# Altium PCB PCB2.PcbDoc
Units mm, origin at the board's own origin, x right, y up, seen from the top; angles counter-clockwise.
Board outline 137 x 56 mm, 2 copper layers (Top Layer, Bottom Layer), stack 1.5 mm thick; 78 components, 61 nets, 299 pads, 83 vias.
Unrouted connection lines stored in the file: 1.
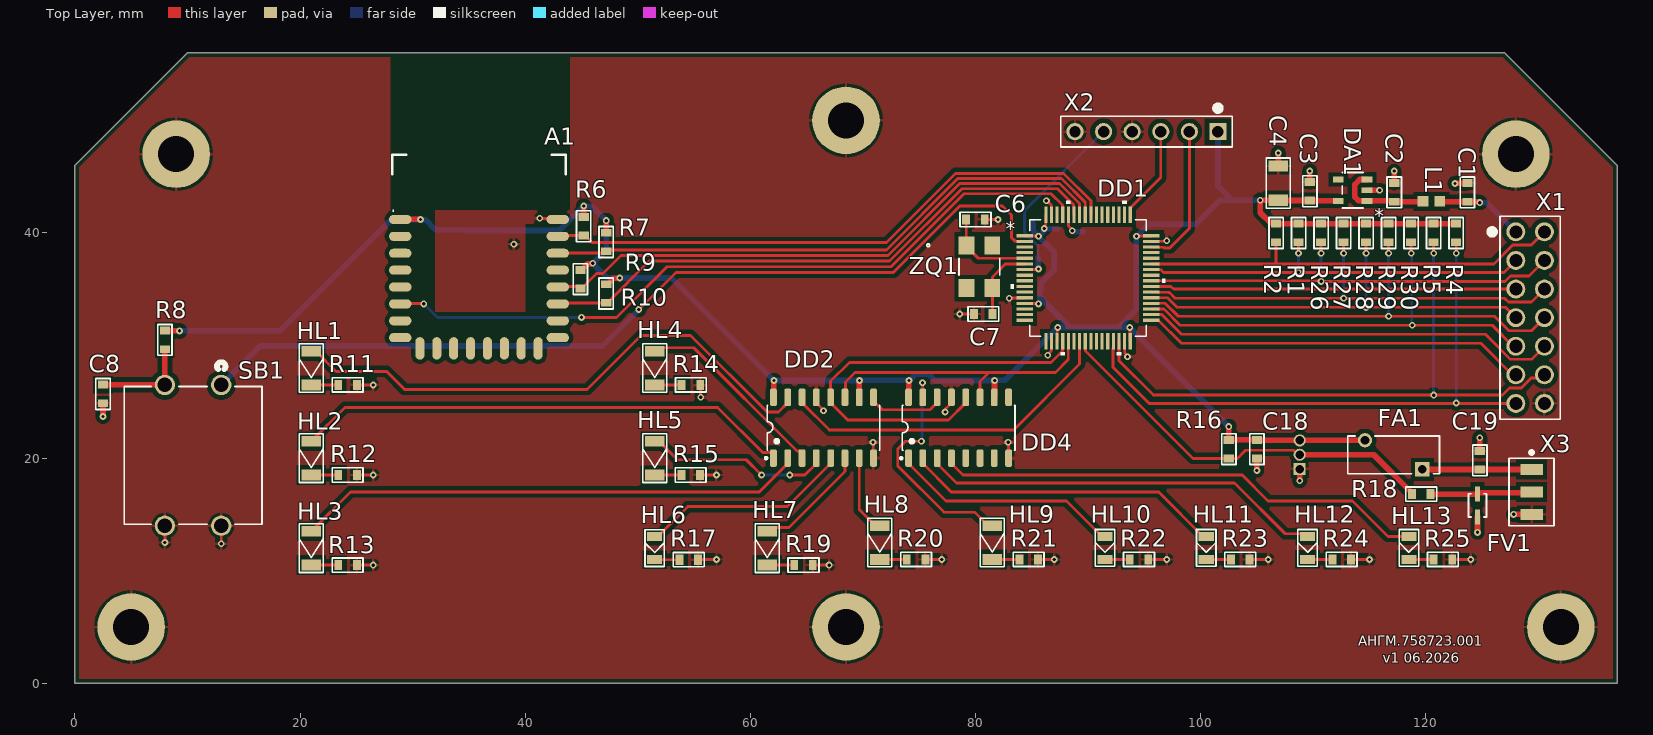
[diagram p0: Top Layer view]
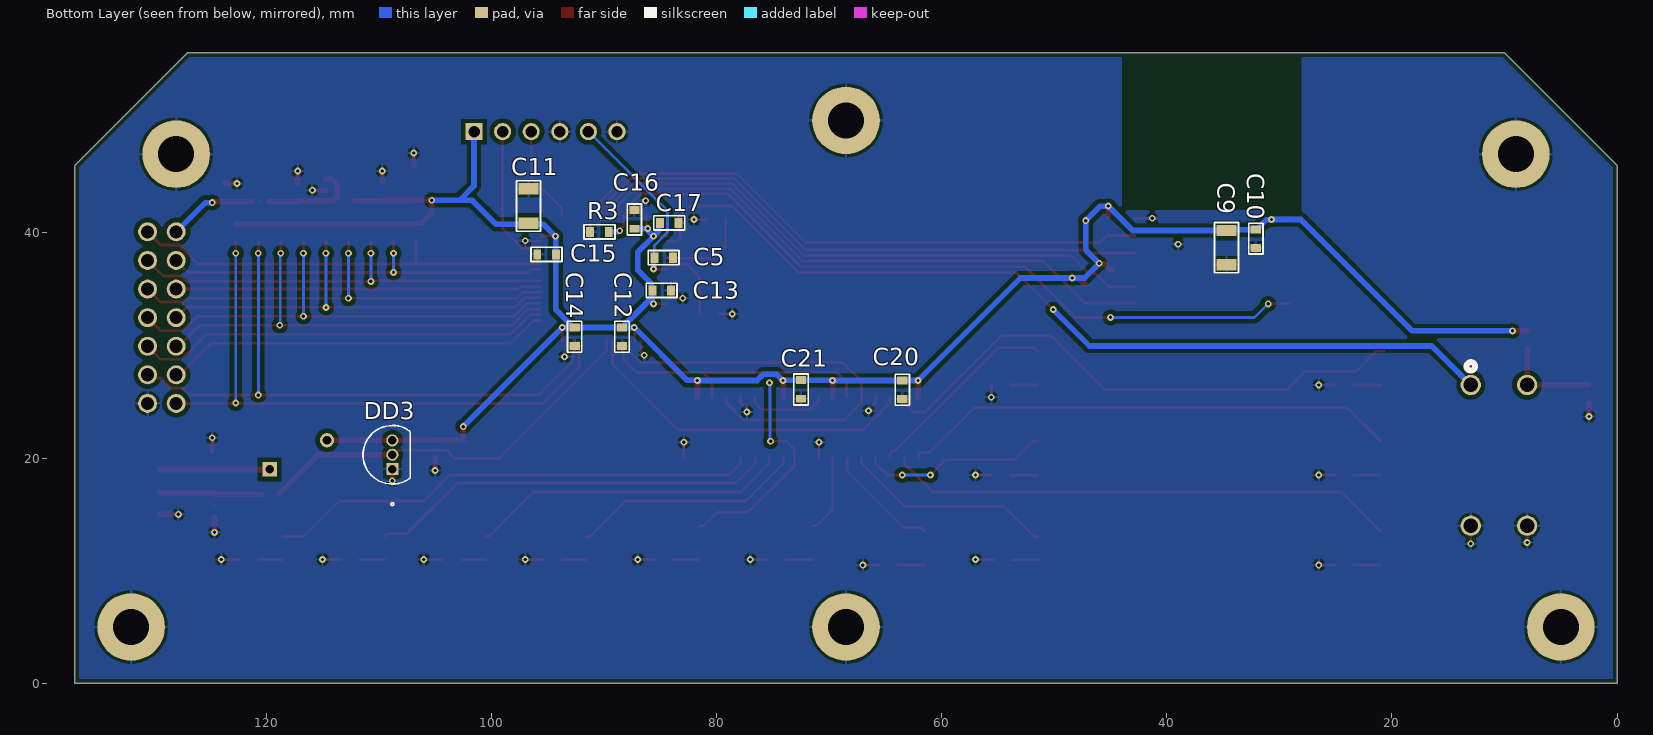
[diagram p1: Bottom Layer view, seen from below]
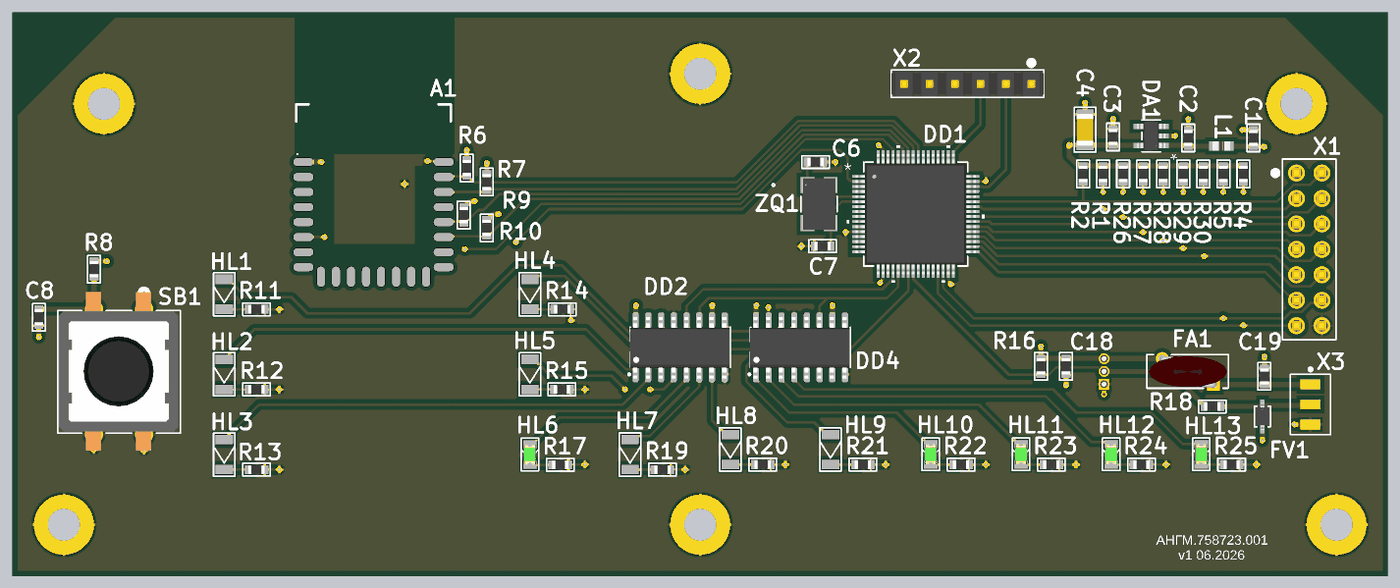
[diagram p2: 3D render of the assembled board from above, using the file's embedded part models]
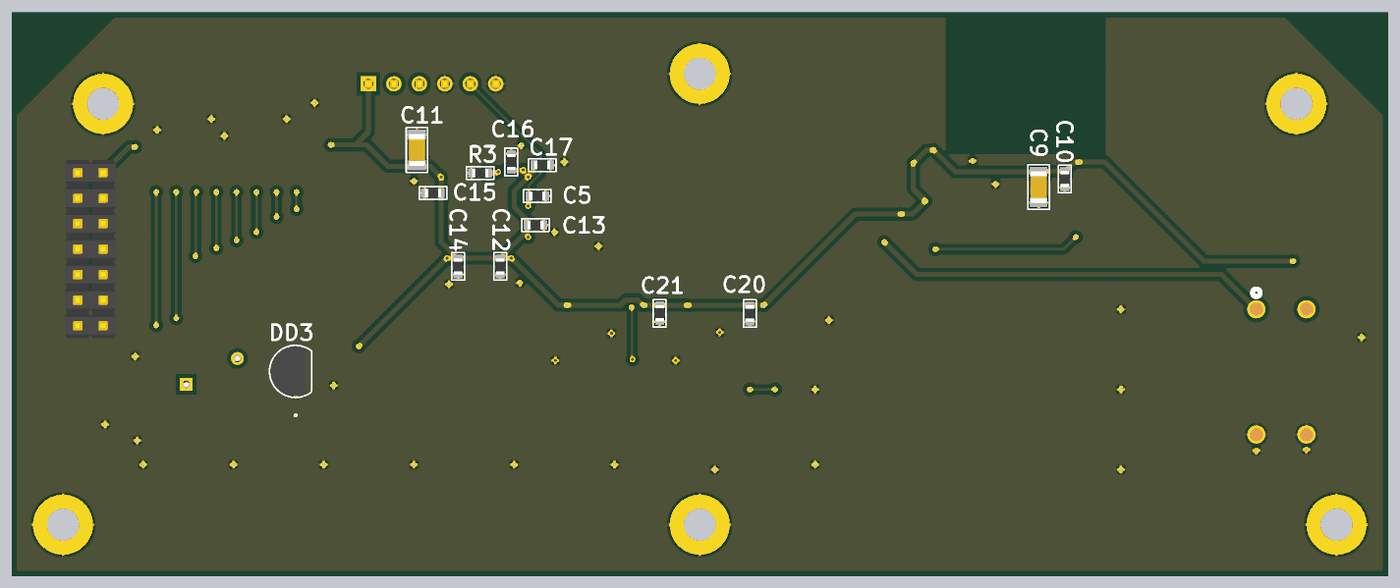
[diagram p3: 3D render of the assembled board from below, using the file's embedded part models]

## Layer stack, top to bottom
Top Solder: solder mask 0.015, Solder Resist, Dk 3.8
Top Layer: signal copper 0.035
Dielectric 1: core 1.43, FR-4, Dk 4.6
Bottom Layer: signal copper 0.035
Bottom Solder: solder mask 0.015, Solder Resist, Dk 3.8

## Board outline
0,0 137,0 137,46 127,56 10,56 0,46

## Design rules (kind name [scope] priority, off if disabled: settings)
BoardOutlineClearance [All] p1: gap=0.4 ignorepadtopadclearanceinfootprint=FALSE
Clearance Polygon [InPolygon] p1: gap=0.4 ignorepadtopadclearanceinfootprint=FALSE
Clearance Clearance_1 [All] p2: gap=0.2 ignorepadtopadclearanceinfootprint=FALSE
ComponentClearance [All] p1: gap=0.25 collisioncheckmode=3 verticalgap=0.25 showdistances=FALSE
HoleSize [All] p1: absolutevalues=TRUE maxlimit=2.54 minlimit=0.3 maxpercent=80.000 minpercent=20.000
MinimumSolderMaskSliver [All] p1: minsoldermaskwidth=0.1
PolygonConnect [All] p1: connectstyle=Relief reliefconductorwidth=0.254 reliefentries=4 polygonreliefangle="90 Angle" airgapwidth=0.254
RoutingVias [All] p1: holewidth=0.3 width=0.6 viastyle="Through Hole" minholewidth=0.3 minwidth=0.6 maxholewidth=1 maxwidth=1.3
SolderMaskExpansion [All] p1: expansion=0.075 istentingtop=FALSE
SupplyNets "Schematic Supply Nets_1" [InNet('3V3')] p1: voltage=0.000
SupplyNets "Schematic Supply Nets" [InNet('GND')] p2: voltage=0.000
UnRoutedNet [All] p1: checkbadconnections=TRUE
Width Width_Power [InNetClass('Power')] p1: maxlimit=3 minlimit=0.5 preferedwidth=1
Width [All] p2: maxlimit=0.5 minlimit=0.2 preferedwidth=0.25
26 further rules are at their usual default settings.

## Classes and differential pairs
component class stm32: A1 C1 C2 C3 C4 C5 C6 C7 C8 C9 C10 C11 C12 C13 C14 C15 C16 C17 DA1 DD1 L1 R1 R2 R3 R4 R5 R6 R7 R8 R9 R10 R26 R27 R28 R29 R30 SB1 X1 X2 ZQ1
component class indication: C18 C19 C20 C21 DD2 DD3 DD4 FA1 FV1 HL1 HL2 HL3 HL4 HL5 HL6 HL7 HL8 HL9 HL10 HL11 HL12 HL13 R11 R12 R13 R14 R15 R16 R17 R18 R19 R20 R21 R22 R23 R24 R25 X3

## Components (designator, comment, footprint, x,y, rotation, side; value= is the part's Value field where it differs from the comment)
A1 "JDY-28M WAVGAT" CAC-150P2011X1495-16N 35.9,36.75 r0 top
C1 "TAJA106K016RNJ Kyocera AVX" RES-0603N 123.7,43.6 r270 top value=10мк
C2 "GRM188R61E105KA12D Murata" RES-0603N 117.2,43.6 r270 top value=1мк
C3 "GRM188R61E105KA12D Murata" RES-0603N 109.7,43.7 r270 top value=1мк
C4 "TAJA106K016RNJ Kyocera AVX" CAP-1206N 106.9,44.425 r270 top
C5 "GRM188R71H104K Murata" RES-0603N 84.7,37.8 r0 bottom value=0.1мк
C6 "CC0603FRNPO9BN220 Yageo" RES-0603N 80,41.2 r180 top value=22
C7 "CC0603FRNPO9BN220 Yageo" RES-0603N 80.7,32.8 r0 top value=22
C8 "GRM188R71H104K Murata" RES-0603N 2.5,25.7 r270 top value=0.1мк
C9 "TAJA106K016RNJ Kyocera AVX" CAP-1206N 34.7,38.7 r90 bottom value=10мк
C10 "GRM188R71H104K Murata" RES-0603N 32.1,39.5 r90 bottom value=0.1мк
C11 "TAJA106K016RNJ Kyocera AVX" CAP-1206N 96.7,42.4 r270 bottom value=10мк
C12 "GRM188R71H104K Murata" RES-0603N 88.4,30.775 r90 bottom value=0.1мк
C13 "GRM188R71H104K Murata" RES-0603N 84.875,34.9 r0 bottom value=0.1мк
C14 "GRM188R71H104K Murata" RES-0603N 92.6,30.775 r90 bottom value=0.1мк
C15 "GRM188R71H104K Murata" RES-0603N 95.1,38.1 r180 bottom value=0.1мк
C16 "GRM188R71H104K Murata" RES-0603N 87.3,41.2 r270 bottom value=0.1мк
C17 "GRM188R71H104K Murata" RES-0603N 84.2,40.9 r0 bottom value=0.1мк
C18 "GRM188R71H104K Murata" RES-0603N 105,20.8 r270 top value=1мк
C19 "GRM188R71H104K Murata" RES-0603N 124.8,19.8 r90 top value=1мк
C20 "GRM188R71H104K Murata" RES-0603N 63.5,26.075 r90 bottom value=0.1мк
C21 "GRM188R71H104K Murata" RES-0603N 72.5,26.1 r90 bottom value=0.1мк
DA1 "ADP150AUJZ-3.3-R7 Analog Devices" UJ_5_ADI 113.5,43.8 r180 top
DD1 "STM32L431RCT6 STMicroelectronics" LQFP-64 90,36 r0 top
DD2 "74HC595D Nexperia" SO-16 66.5,22.7 r0 top
DD3 "NS18B20-QTOS Novosense" 21-0248A_Q3-1_MXM 108.8,19.03 r90 bottom
DD4 "74HC595D Nexperia" SO-16 78.5,22.7 r0 top
FA1 "MF-R005-0 Bourns" FUSE_MF-R050-0-17_BRN 119.7,19 r180 top
FV1 "PESD3V3L1BA Keen Side" SOD323_NEX 124.6,15.8 r270 top
HL1 "APTD3216LCGCK Kingbright" LED-1206N 21,28 r90 top
HL2 "APTD3216LCGCK Kingbright" LED-1206N 21,20 r90 top
HL3 "APTD3216LCGCK Kingbright" LED-1206N 21,12 r90 top
HL4 "APTD3216LCGCK Kingbright" LED-1206N 51.501,28.001 r90 top
HL5 "APTD3216LSYCK Kingbright" LED-1206N 51.501,20.001 r90 top
HL6 "APTD2012LSURCK Kingbright" LED-0805N 51.501,12.001 r90 top
HL7 "APTD3216LCGCK Kingbright" LED-1206N 61.501,12.001 r90 top
HL8 "APTD3216LCGCK Kingbright" LED-1206N 71.501,12.501 r90 top
HL9 "APTD3216LCGCK Kingbright" LED-1206N 81.501,12.501 r90 top
HL10 "APTD2012LSURCK Kingbright" LED-0805N 91.501,12.026 r90 top
HL11 "APTD2012LSURCK Kingbright" LED-0805N 100.501,12.026 r90 top
HL12 "APTD2012LSURCK Kingbright" LED-0805N 109.501,12.026 r90 top
HL13 "APTD2012LSURCK Kingbright" LED-0805N 118.501,12.026 r90 top
L1 "BLM18AG601SN1D Murata Electronics" FILTER_BLM18AG_MUR 120.5,42.8 r180 top
R1 "RC0603FR-072K2L Yageo" RES-0603N 108.7,40 r90 top value=2.2к
R2 "RC0603FR-072K2L Yageo" RES-0603N 106.7,40 r90 top value=2.2к
R3 "RC0603FR-0710KL Yageo" RES-0603N 90.4,40.1 r180 bottom value=10к
R4 "RC0603FR-072K2L Yageo" RES-0603N 122.7,40 r90 top value=2.2к
R5 "RC0603FR-072K2L Yageo" RES-0603N 120.7,40 r90 top value=2.2к
R6 "RC0603FR-0710KL Yageo" RES-0603N 45.2,40.6 r90 top value=10к
R7 "RC0603FR-0710KL Yageo" RES-0603N 47.2,39.2 r90 top value=10к
R8 "RC0603FR-0710KL Yageo" RES-0603N 8,30.5 r90 top value=10к
R9 "RC0603FR-0710KL Yageo" RES-0603N 44.9,35.9 r270 top value=10к
R10 "RC0603FR-0710KL Yageo" RES-0603N 47.2,34.625 r270 top value=10к
R11 "RC0603FR-0747RL Yageo" RES-0603N 24.225,26.5 r0 top value=47
R12 "RC0603FR-0747RL Yageo" RES-0603N 24.225,18.5 r0 top value=47
R13 "RC0603FR-0747RL Yageo" RES-0603N 24.225,10.5 r0 top value=47
R14 "RC0603FR-0747RL Yageo" RES-0603N 54.726,26.501 r0 top value=47
R15 "RC0603FR-07180RL Yageo" RES-0603N 54.701,18.501 r0 top value=180
R16 "RC0603FR-074K7L Yageo" RES-0603N 102.5,20.8 r90 top value=4.7к
R17 "RC0603FR-07200RL Yageo" RES-0603N 54.526,10.976 r0 top value=200
R18 "RC0603FR-0751RL Yageo" RES-0603N 119.6,16.8 r180 top value=51
R19 "RC0603FR-0747RL Yageo" RES-0603N 64.726,10.501 r0 top value=47
R20 "RC0603FR-0747RL Yageo" RES-0603N 74.726,11.001 r0 top value=47
R21 "RC0603FR-0747RL Yageo" RES-0603N 84.726,11.001 r0 top value=47
R22 "RC0603FR-07200RL Yageo" RES-0603N 94.526,11.001 r0 top value=200
R23 "RC0603FR-07200RL Yageo" RES-0603N 103.526,11.001 r0 top value=200
R24 "RC0603FR-07200RL Yageo" RES-0603N 112.526,11.001 r0 top value=200
R25 "RC0603FR-07200RL Yageo" RES-0603N 121.526,11.001 r0 top value=200
R26 "RC0603FR-0710KL Yageo" RES-0603N 110.7,40 r90 top value=10k
R27 "RC0603FR-0710KL Yageo" RES-0603N 112.7,40 r90 top value=10k
R28 "RC0603FR-0710KL Yageo" RES-0603N 114.7,40 r90 top value=10k
R29 "RC0603FR-0710KL Yageo" RES-0603N 116.7,40 r270 top value=10k
R30 "RC0603FR-0710KL Yageo" RES-0603N 118.7,40 r270 top value=10k
SB1 "KAN1211-1201B KAN" SW4_PTS125SM432LFS_CNK 13,26.5 r270 top
X1 "DS1021-2x7 Connfly" CONN_215447-7_TEC 128,40.1 r270 top
X2 "DS1022-1x6R Connfly" CONN_2011-1X06G00SB_06P_OUP 101.54,49 r180 top
X3 "DS1110-01-3 Connfly" CONN3_1546551-3_TEC 129.4,18 r270 top
ZQ1 "KSE-7I08000MAF343ZA3 KEEN SIDE" C5S_5X3P2_SMD_AKR 80.35,37 r0 top

## Footprints (in the part's own frame and the unit in brackets; to place one, negate y for a bottom-side part, rotate by r counter-clockwise, add the part's x,y. Pads: shape width x height; smd on the part's side, far side on the other; paste and mask are expansions set on the pad)
21-0248A_Q3-1_MXM [mm]
  rect 1.07x1.07 / inner round 1.524 / far side rect 1.07x1.07 hole 0.762 paste-2539.97 mask+0: 1(0,0)
  round 1.07 / inner round 1.524 / far side round 1.07 hole 0.762 paste-2539.97 mask+0: 2(1.27,0) 3(2.54,0)
  silkscreen extent -3.24,-1.59 3.87,2.6, body extent -1.21,-0.95 3.75,2.48, height 8.95
C5S_5X3P2_SMD_AKR [mm]
  rect 1.397x1.6 smd paste+0 mask+0: 1(-1.15,1.9) 2(-1.15,-1.9) 3(1.15,-1.9) 4(1.15,1.9)
  silkscreen extent -4.68,-0.77 1.8,2.03, body extent -1.68,-2.58 1.68,2.58, height 0.76
CAC-150P2011X1495-16N [mm] "Chip Array, Concave, 16-Leads, Pitch 1,50mm,  Body 20,11x14,95mm,  IPC Medium Density"
  oval 2x0.8 smd: 1(-7,4.45) 2(-7,2.95) 3(-7,1.45) 4(-7,-0.05) 5(-7,-1.55) 6(-7,-3.05) 7(-7,-4.55) 8(-7,-6.05) 17(7,-6.05) 18(7,-4.55) 19(7,-3.05) 20(7,-1.55) 21(7,-0.05) 22(7,1.45) 23(7,2.95) 24(7,4.45)
  oval 0.8x2 smd: 9(-5.25,-7) 10(-3.75,-7) 11(-2.25,-7) 12(-0.75,-7) 13(0.75,-7) 14(2.25,-7) 15(3.75,-7) 16(5.25,-7)
  silkscreen extent -7.7,5.19 7.7,10.2
CAP-1206N [mm] "Chip Capacitor, 2-Leads, Body 3,20x1,60mm, IPC Medium Density"
  rect 1x1.75 smd: 1(-1.525,0) 2(1.525,0)
  silkscreen extent -2.24,-1.07 2.24,1.07, body extent -1.6,-0.8 1.6,0.8, height 1.6
CONN3_1546551-3_TEC [mm]
  rect 1x2 smd paste-2539.97 mask+0: 1(1,0) 2(-1,0) 3(3,0)
  silkscreen extent -2.65,-2 4,2
CONN_2011-1X06G00SB_06P_OUP [mil]
  rect 60x60 / inner round 60 / far side rect 60x60 hole 40 paste-99999 mask+0: 1(0,0)
  round 60 hole 40 paste-99999 mask+0: 2(100,0) 3(200,0) 4(300,0) 5(400,0) 6(500,0)
  silkscreen extent -50,-92 550,54, body extent -50,-49 550,49, height 339
CONN_215447-7_TEC [mil]
  round 66 / inner round 60 / far side round 66 hole 46 paste-99999 mask+0: 1(0,0) 2(0,100) 3(100,0) 4(100,100) 5(200,0) 6(200,100) 7(300,0) 8(300,100) 9(400,0) 10(400,100) 11(500,0) 12(500,100) 13(600,0) 14(600,100)
  silkscreen extent -55,-93 655,155, body extent -51,-50 649,150, height 141
FILTER_BLM18AG_MUR [mil]
  rect 37.78x37 smd paste+0 mask+0: 1(-29.39,0) 2(29.39,0)
  Top Layer keep-out region: 0,0 0,0 0,0 0,0
  Keep-Out Layer region: 0,0 0,0 0,0
  body extent -34,-19 34,19, height 37
FUSE_MF-R050-0-17_BRN [mm]
  rect 1.27x1.27 / inner round 1.524 / far side rect 1.27x1.27 hole 0.762 paste-2539.97 mask+0: 1(0,0)
  round 1.27 / inner round 1.524 / far side round 1.27 hole 0.762 paste-2539.97 mask+0: 2(5.1,-2.59)
  silkscreen extent -1.53,-2.97 6.63,0.38, body extent -1.41,-2.85 6.49,0.31, height 13.15
LED-0805N [mm] "Chip Resistor, 2-Leads, Body 2,10x1,30mm, IPC Medium Density"
  rect 0.8x1.35 smd: 1(1.025,0) 2(-1.025,0)
  silkscreen extent -1.63,-0.86 1.63,0.86, body extent -1.01,-0.62 1.01,0.62, height 1.1
LED-1206N [mm]
  rect 0.95x1.75 smd: 1(1.5,0) 2(-1.5,0)
  silkscreen extent -2.16,-1.07 2.16,1.07, body extent -1.55,-0.8 1.55,0.8, height 0.55
LQFP-64 [mil]
  rect 57.56x11 smd paste+0 mask+0: 1(-221.5,147.64) 2(-221.5,127.95) 3(-221.5,108.27) 4(-221.5,88.58) 5(-221.5,68.9) 6(-221.5,49.21) 7(-221.5,29.53) 8(-221.5,9.84) 9(-221.5,-9.84) 10(-221.5,-29.53) 11(-221.5,-49.21) 12(-221.5,-68.9) 13(-221.5,-88.58) 14(-221.5,-108.27) 15(-221.5,-127.95) 16(-221.5,-147.64) 33(221.5,-147.64) 34(221.5,-127.95) 35(221.5,-108.27) 36(221.5,-88.58) 37(221.5,-68.9) 38(221.5,-49.21) 39(221.5,-29.53) 40(221.5,-9.84) 41(221.5,9.84) 42(221.5,29.53) 43(221.5,49.21) 44(221.5,68.9) 45(221.5,88.58) 46(221.5,108.27) 47(221.5,127.95) 48(221.5,147.64)
  rect 11x57.56 smd paste+0 mask+0: 17(-147.64,-221.5) 18(-127.95,-221.5) 19(-108.27,-221.5) 20(-88.58,-221.5) 21(-68.9,-221.5) 22(-49.21,-221.5) 23(-29.53,-221.5) 24(-9.84,-221.5) 25(9.84,-221.5) 26(29.53,-221.5) 27(49.21,-221.5) 28(68.9,-221.5) 29(88.58,-221.5) 30(108.27,-221.5) 31(127.95,-221.5) 32(147.64,-221.5) 49(147.64,221.5) 50(127.95,221.5) 51(108.27,221.5) 52(88.58,221.5) 53(68.9,221.5) 54(49.21,221.5) 55(29.53,221.5) 56(9.84,221.5) 57(-9.84,221.5) 58(-29.53,221.5) 59(-49.21,221.5) 60(-68.9,221.5) 61(-88.58,221.5) 62(-108.27,221.5) 63(-127.95,221.5) 64(-147.64,221.5)
  silkscreen extent -270,-270 270,270, body extent -236,-236 236,236, height 63
RES-0603N [mm] "Chip Resistor, 2-Leads, Body 1,60x0,85mm, IPC Medium Density"
  rect 0.7x0.9 smd: 1(-0.825,0) 2(0.825,0)
  silkscreen extent -1.37,-0.64 1.37,0.64, body extent -0.8,-0.43 0.8,0.43, height 0.45
SO-16 [mm]
  rrect50% 0.6x1.55 smd mask+0.05: 1(-4.445,-2.7) 2(-3.175,-2.7) 3(-1.905,-2.7) 4(-0.635,-2.7) 5(0.635,-2.7) 6(1.905,-2.7) 7(3.175,-2.7) 8(4.445,-2.7) 9(4.445,2.7) 10(3.175,2.7) 11(1.905,2.7) 12(0.635,2.7) 13(-0.635,2.7) 14(-1.905,2.7) 15(-3.175,2.7) 16(-4.445,2.7)
  silkscreen extent -5.19,-2.8 5.01,2, body extent -5.03,-3.12 4.94,3.02, height 1.73
SOD323_NEX [mil]
  rect 53.5x18 smd paste+0 mask+0: 1(-40.25,0) 2(40.25,0)
  Keep-Out Layer region: 0,0 0,0 0,0 0,0
  silkscreen extent -41,-32 41,32, body extent -53,-26 53,26, height 43
SW4_PTS125SM432LFS_CNK [mil]
  round 71 hole 51 paste-99999 mask+0: 1(0,0) 2(0,-196.85) 3(492.13,0) 4(492.13,-196.85)
  silkscreen extent -80,-339 487,143, body extent -67,-336 555,136, height 512
UJ_5_ADI [mil]
  rect 37.28x20 smd paste+0 mask+0: 1(-50.14,37.4) 2(-50.14,0) 3(-50.14,-37.4) 4(50.14,-37.4) 5(50.14,37.4)
  silkscreen extent -37,-62 37,62, body extent -55,-57 55,57, height 39

## Part data
A1: library part JDY-28M, Group=Модуль, Name="JDY-28M WAVGAT"
C1 C2 C3 C4 C5 C6 C7 C8 C9 C10 C11 C12 C13 C14 C15 C16 C17 C18 C19 C20 C21: library part CAP, Group=Конденсатор
  C1 C4 C9 C11: Name="TAJA106K016RNJ Kyocera AVX", Причечание="10 мкФ - 16 В - тип A ±10% танталовый"
  C2 C3 C18 C19: Name="GRM188R61E105KA12D Murata", Причечание="1 мкФ - 25 В - X5R ±10%"
  C5 C8 C10 C12 C13 C14 C15 C16 C17 C20 C21: Name="GRM188R71H104K Murata", Причечание="0.1 мкФ - 50 В - X7R ±10%"
  C6 C7: Name="CC0603FRNPO9BN220 Yageo", Причечание="22 пФ - 50 В - NP0 ±1%"
DA1: library part ADP150AUJZ-3.3-R7, "Ultralow Noise, 150 mA CMOS Linear Regulator", Manufacturer_Name="Analog Devices Inc", Copyright="Copyright (C) 2025 Ultra Librarian. All rights reserved.", Group=Микросхема, Manufacturer_Part_Number=ADP150AUJZ-3.3-R7, Name="ADP150AUJZ-3.3-R7 Analog Devices", RefDes=RefDes, Type=Type, Причечание="Линейный стабилизатор 3.3В"
DD1: library part STM32L431RCT6, Group=Микросхема, Name="STM32L431RCT6 STMicroelectronics", Причечание="Микроконтроллер ARM 32-bit Cortex-M4"
DD2 DD4: library part 74HC595, "8-Bit Shift Register with 3-State Output Registers", Group=Микросхема, Name="74HC595D Nexperia", OriginalSource=AltTab, Причечание="8-битный сдвиговый регистр"
DD3: library part DS18B20+, "Programmable Resolution 1-Wire Digital Thermometer", Manufacturer_Name="Analog Devices Inc", Copyright="Copyright (C) 2025 Ultra Librarian. All rights reserved.", Group=Микросхема, Manufacturer_Part_Number=DS18B20+, Name="NS18B20-QTOS Novosense", RefDes=RefDes, Type=Type, Причечание="Высокоточный датчик температуры"
FA1: library part MF-R050-0-17, "MF-R050-0-17", Manufacturer_Name="Bourns Electronics", Copyright="Copyright (C) 2025 Ultra Librarian. All rights reserved.", Group=Предохранитель, Manufacturer_Part_Number=MF-R050-0-17, Name="MF-R005-0 Bourns", Причечание="Самовосстанавливающийся 0.05А"
FV1: library part PESD3V3L1BA, "Description", Manufacturer_Name=Nexperia, Copyright="Copyright (C) 2025 Ultra Librarian. All rights reserved.", Group=Диод, Manufacturer_Part_Number=PESD3V3L1BA, Name="PESD3V3L1BA Keen Side", Причечание="TVS-диод (защита от ESD) 3.3В"
HL1 HL2 HL3 HL4 HL5 HL6 HL7 HL8 HL9 HL10 HL11 HL12 HL13: library part LED, "Light Emittering Diode", Package=*0603, PartValue="LED*0603 *", Group=Диод, OriginalSource=AltTab
  HL1 HL2 HL3 HL4 HL7 HL8 HL9: Name="APTD3216LCGCK Kingbright", Причечание="Светодиод зеленый"
  HL5: Name="APTD3216LSYCK Kingbright", Причечание="Светодиод желтый"
  HL6 HL10 HL11 HL12 HL13: Name="APTD2012LSURCK Kingbright", Причечание="Светодиод красный"
L1: library part BLM18AG601SN1D, Group=Дроссель, Name="BLM18AG601SN1D Murata Electronics", Причечание="Дроссель подавления ЭМП 600 Ом, 0.5А"
R1 R2 R3 R4 R5 R6 R7 R8 R9 R10 R11 R12 R13 R14 R15 R16 R17 R18 R19 R20 R21 R22 R23 R24 R25 R26 R27 R28 R29 R30: library part RES, Group=Резистор
  R1 R2 R4 R5: Name="RC0603FR-072K2L Yageo", Причечание="0.1 Вт - 2.2 кОм ±1%"
  R3 R6 R7 R8 R9 R10 R26 R27 R28 R29 R30: Name="RC0603FR-0710KL Yageo", Причечание="0.1 Вт - 10 кОм ±1%"
  R11 R12 R13 R14 R19 R20 R21: Name="RC0603FR-0747RL Yageo", Причечание="0.1 Вт - 47 Ом ±1%"
  R15: Name="RC0603FR-07180RL Yageo", Причечание="0.1 Вт - 180 Ом ±1%"
  R16: Name="RC0603FR-074K7L Yageo", Причечание="0.1 Вт - 4.7 кОм ±1%"
  R17 R22 R23 R24 R25: Name="RC0603FR-07200RL Yageo", Причечание="0.1 Вт - 200 Ом ±1%"
  R18: Name="RC0603FR-0751RL Yageo", Причечание="0.1 Вт - 51 Ом ±1%"
SB1: library part KAN1211-1201B, "KAN1211-1201B", Manufacturer_Name="C&K Components", Manufacturer_Part_Number=PTS125SM432LFS, Copyright="Copyright (C) 2025 Ultra Librarian. All rights reserved.", Group=Кнопка, Name="KAN1211-1201B KAN", Причечание="Кнопка тактовая 12x12x12 мм"
X1: library part 215447-7, "2x7 POS AMPMODU MOD II HDR ACTION PIN", Manufacturer_Name="TE Connectivity", Copyright="Copyright (C) 2025 Ultra Librarian. All rights reserved.", Group=Вилка, Manufacturer_Part_Number=215447-7, Name="DS1021-2x7 Connfly", RefDes=RefDes, Type=Type, Причечание="Вилка штыревая прямая 2.54мм 2x7 pin"
X2: library part 2011-1X06G00SB, "KLS1-207-1-06-S, Вилка штыревая 2.54мм 1x6 угловая", Manufacturer_Name=Oupiin, Copyright="Copyright (C) 2025 Ultra Librarian. All rights reserved.", Group=Вилка, Manufacturer_Part_Number=2011-1X06G00SB, Name="DS1022-1x6R Connfly", RefDes=RefDes, Type=Type, Причечание="Вилка штыревая угловая 2.54мм 1x6 pin"
X3: library part 1546551-3, "3P,STRAIGHT,SIDE ENTRY,3.5MM", Manufacturer_Name="TE Connectivity", Copyright="Copyright (C) 2026 Ultra Librarian. All rights reserved.", Group=Вилка, Manufacturer_Part_Number=1546551-3, Name="DS1110-01-3 Connfly", RefDes=RefDes, Type=Type, Причечание="Разъем миниатюрный 3 pin"
ZQ1: library part C5S-8.000-18-3030-X-R, "KSE-7I08000MAF343ZA3", Manufacturer_Name=Aker, Copyright="Copyright (C) 2025 Ultra Librarian. All rights reserved.", Group=Резонатор, Manufacturer_Part_Number=C5S-8.000-18-3030-X-R, Name="KSE-7I08000MAF343ZA3 KEEN SIDE", RefDes=RefDes, Type=Type

## Free pads (board coordinates)
  round 6 hole 3.2 paste-2539.97: 1(9,47) 2(68.5,50) 3(128,47) 4(132,5) 5(68.5,5) 6(5,5)

## Via types
v1: diameter 0.6, hole 0.3, Top Layer to Bottom Layer, 83 vias

## Nets (pads, with @x,y where several pads share a name; then routed paths per layer and width w, separated by ;. In a path a pad name is that pad's centre, name@x,y a point inside that pad or via, vN(x,y) a via of type N, cw(c..) or ccw(c..) an arc to the next point about the centre after c; other vN are vias at no path point)
3V3: A1.1 C3.2 C4.2 C9.2 C10.2 C11.2 C12.2 C13.2 C14.2 C15.2 C16.2 C17.2 C18.1 C20.2 C21.2 DA1.5 DD1.1 DD1.13 DD1.19 DD1.32 DD1.48 DD1.64 DD2.10 DD2.16 DD3.3 DD4.10 DD4.16 FA1.2 R1.2 R2.2 R4.2 R5.2 R6.2 R7.2 R8.2 R9.1 R10.1 R16.2 R26.2 R27.2 R28.2 R29.1 R30.1 X2.1 | length 217.7
  Top Layer w0.25: DD2.16 DD2.16@62.078,25.423 ; DD4.16 DD4.16@74.077,25.422 ; DD4.10 DD4.10@81.687,25.412 ; DD1.13 84.389,33.735 85.565,33.735 v1(85.6,33.7) ; DD1.1 84.389,39.735 85.565,39.735 v1(85.6,39.7) ; v1(86.1,40.4) 86.167,40.467 86.167,40.662 86.235,40.73 86.235,41.611 DD1.64 ; DD1.19 87.265,30.389 87.265,31.565 v1(87.3,31.6) ; v1(93.7,31.6) 93.735,31.565 93.735,30.389 DD1.32 ; v1(94.3,39.7) 94.335,39.735 95.611,39.735 DD1.48
  Top Layer w0.5: R8.2 8.012,31.313 9.287,31.313 v1(9.3,31.3) ; A1.1@29.125,41.275 29.181,41.219 30.681,41.219 v1(30.7,41.2) ; R9.1 45,36.725 45.556,37.281 45.981,37.281 v1(46,37.3) ; R6.2 v1(45.2,42.4) ; R10.1 47.3,35.45 47.831,35.981 48.381,35.981 v1(48.4,36) ; R7.2 v1(47.2,41.1) ; DD2.16@62.078,25.423 v1@62.078,26.878 ; DD2.10 69.687,25.412 69.687,26.887 v1(69.7,26.9) ; DD4.16@74.077,25.422 v1@74.077,26.878 ; DD4.10@81.687,25.412 v1@81.687,26.888 ; v1(102.5,22.8) R16.2 C18.1 105.027,21.598 108.773,21.598 DD3.3 108.81,21.58 FA1.2@114.6,21.58 ; DA1.5 112.222,42.854 109.721,42.854 C3.2 109.687,42.888 106.912,42.888 C4.2 v1(105.3,42.9) 105.3,41.8 106.2,40.9 106.625,40.9 R2.2 R1.2 R26.2 R27.2 R28.2 R29.1 R30.1 R5.2 R4.2
  Bottom Layer w0.5: v1(9.3,31.3) 18.2,31.3 28.1,41.2 v1(30.7,41.2) 30.719,41.181 31.144,41.181 32,40.325 C10.2 32.15,40.275 34.65,40.275 C9.2 43.025,40.225 v1(45.2,42.4) 45.219,42.381 45.919,42.381 v1(47.2,41.1) 47.2,38.5 v1(46,37.3) 47.3,36 v1(48.4,36) 53,36 v1(62.1,26.9) C20.2 v1(69.7,26.9) 69.713,26.913 72.488,26.913 C21.2 72.512,26.913 74.087,26.913 v1(74.1,26.9) 74.127,26.9 74.677,27.45 75.85,27.45 76.4,26.9 v1(81.7,26.9) 81.719,26.919 82.619,26.919 v1(87.3,31.6) C12.2@88.3,31.6 ; C17.2@85.025,41 C17.2 85.125,40.8 85.125,40.202 85.6,39.727 v1(85.6,39.7) ; v1(85.6,33.7) 85.6,33.727 85.7,33.827 C13.2 85.8,35 85.8,35.5 87,36.7 87,38.3 v1(85.6,39.7) ; 85.8,34.2 88.2,31.8 88.2,31.7 C12.2@88.3,31.6 ; C16.2 87.288,40.387 86.113,40.387 v1(86.1,40.4) 86.081,40.381 86.081,40.181 v1(85.6,39.7) ; X2.1 101.54,44.198 102.838,42.9 ; v1(102.5,22.8) v1(93.7,31.6) C14.2@92.7,31.6 ; v1(105.3,42.9) 102.838,42.9 ; C12.2@88.3,31.6 C12.2 C14.2 C14.2@92.7,31.6 ; C14.2@92.7,31.6 94.275,33.175 C15.2 94.288,38.112 94.288,39.688 v1(94.3,39.7) 95.375,40.775 99.575,40.775 101.7,42.9 102.838,42.9
BAT_SEL: DD1.34 X1.10 | length 37
  Top Layer w0.25: DD1.34 96.55,32.75 98.3,31 125.295,31 127.518,28.777 128,28.777 129.377,28.777 X1.10
BATT_EN: DD1.33 X1.11 | length 34.4
  Top Layer w0.25: DD1.33 95.641,32.235 96.265,32.235 98.3,30.2 124.9,30.2 127.7,27.4 X1.11
BLE_PWRC: A1.22 DD1.57 R7.1 | length 51.6
  Top Layer w0.25: A1.22@42.85,38.25 42.887,38.212 47.163,38.212 R7.1@47.2,38.175 ; R7.1 47.325,38.5 72.091,38.5 78.423,44.832 87.647,44.832 89.747,42.732 89.747,41.629 DD1.57
BLE_RST: A1.23 DD1.56 R6.1 | length 52.4
  Top Layer w0.25: A1.23@42.85,39.75 42.863,39.762 45.187,39.762 R6.1 45.3,39.775 45.925,39.15 72.104,39.15 78.237,45.282 87.834,45.282 90.25,42.866 DD1.56
BLE_RX: A1.19 DD1.59 R10.2 | length 51.5
  Top Layer w0.25: A1.19@42.85,33.75 42.875,33.775 47.175,33.775 R10.2 ; R10.2@47.3,33.8 51,37.5 72.364,37.5 78.796,43.932 87.274,43.932 88.735,42.471 88.735,41.641 DD1.59
BLE_STAT: A1.6 DD1.61 | length 64.9
  Top Layer w0.25: A1.6@29.15,33.75 29.175,33.725 30.975,33.725 v1(31,33.7) ; v1(45,32.5) 48.1,32.5 52.6,37 72.5,37 78.982,43.482 86.724,43.482 87.735,42.471 87.735,41.641 DD1.61
  Bottom Layer w0.25: v1(31,33.7) 32.2,32.5 v1(45,32.5)
BLE_TX: A1.20 DD1.58 R9.2 | length 51.8
  Top Layer w0.25: A1.20@42.85,35.25 R9.2@45.1,35.25 ; R9.2@45.2,35.275 45.225,35.3 46.325,36.4 46.9,36.4 48.5,38 72.227,38 78.609,44.382 87.461,44.382 89.235,42.608 89.235,41.641 DD1.58
BTN: C8.1 DD1.2 R8.1 SB1.1 SB1.2 | length 89.1
  Top Layer w0.25: C8.1 C8.1@2.512,26.512 ; SB1.2@7.987,26.512 SB1.2 ; v1(50.1,33.2) 53.4,36.5 72.7,36.5 78.6,42.4 82.4,42.4 83.214,41.586 83.214,39.579 83.529,39.265 84.359,39.265 DD1.2
  Top Layer w0.5: C8.1@2.512,26.512 SB1.2@7.987,26.512 ; SB1.2 R8.1
  Bottom Layer w0.5: SB1.1 16.465,29.965 46.865,29.965 v1(50.1,33.2)
GND: A1.24 C1.1 C2.1 C3.1 C4.1 C5.1 C6.1 C7.1 C8.2 C9.1 C10.1 C11.1 C12.1 C13.1 C14.1 C15.1 C16.1 C17.1 C18.2 C19.2 C20.1 C21.1 DA1.2 DD1.12 DD1.18 DD1.31 DD1.47 DD1.63 DD2.8 DD2.13 DD3.1 DD4.8 DD4.13 FV1.2 pad.1 pad.2 pad.3 pad.4 pad.5 pad.6 R3.1 R11.2 R12.2 R13.2 R14.2 R15.2 R17.2 R19.2 R20.2 R21.2 R22.2 R23.2 R24.2 R25.2 SB1.3 SB1.4 X1.14 X2.4 X2.6 X3.3 | length 52.4
  Top Layer w0.25: v1(8,12.5) SB1.4 ; v1(13,12.4) SB1.3 ; R13.2 v1(26.5,10.5) ; R12.2 v1(26.5,18.5) ; R11.2 v1(26.5,26.5) ; v1(41.3,41.3) 41.325,41.275 42.825,41.275 A1.24@42.85,41.25 ; R17.2 55.375,11 v1(57,11) ; R15.2@55.526,18.5 v1(57,18.5) ; R14.2 55.575,26.476 55.575,25.425 v1(55.6,25.4) ; R19.2@65.551,10.5 v1(67,10.5) ; DD2.13 65.865,24.911 66.5,24.276 v1(66.5,24.2) ; v1(70.9,21.4) 70.922,21.378 70.922,20.022 DD2.8 ; R20.2@75.551,11 v1(77,11) ; v1(77.3,24.1) 77.367,24.167 77.367,24.413 77.865,24.911 DD4.13 ; v1(78.6,32.8) C7.1 ; C6.1 v1(82,41.2) ; v1(82.9,21.4) 82.922,21.378 82.922,20.023 DD4.8 ; v1(83,34.2) 83.035,34.235 84.359,34.235 DD1.12 ; R21.2@85.551,11 v1(87,11) ; v1(86.3,42.857) 86.349,42.857 86.735,42.471 86.735,41.641 DD1.63 ; v1(86.432,29.145) 86.432,29.225 86.735,29.529 86.735,30.359 DD1.18 ; DD1.31 93.265,30.359 93.265,29.33 93.5,29.095 v1(93.5,29) ; R22.2 v1(97,11) ; DD1.47 95.641,39.265 96.965,39.265 v1(97,39.3) ; R23.2 v1(106,11) ; R24.2@113.351,11 v1(115,11) ; R25.2 v1(124,11)
  Top Layer w0.5: v1(2.5,23.7) C8.2 ; v1(105,18.9) C18.2 ; C4.1 v1(106.9,47.1) ; v1(108.8,18) DD3.1 ; C3.1 v1(109.7,45.5) ; DA1.2 v1(115.9,43.8) ; C2.1 v1(117.2,45.5) ; v1(122.6,44.4) 122.613,44.412 123.687,44.412 C1.1 ; v1(124.6,13.4) FV1.2 ; C19.2 v1(124.8,21.8) ; v1(127.8,15) X3.3
  other v1: 39,39
I2C1_PM_SCL: DD1.42 R1.1 X1.3 | length 35.6
  Top Layer w0.25: DD1.42 95.641,36.735 96.471,36.735 96.706,36.5 v1(108.7,36.5) 126.94,36.5 X1.3 ; v1(108.7,38.2) R1.1
  Bottom Layer w0.25: v1(108.7,36.5) v1(108.7,38.2)
I2C1_PM_SDA: DD1.43 R2.1 X1.2 | length 38
  Top Layer w0.25: DD1.43 106.7,37.25 ; R2.1 106.7,37.25 ; X1.2 129.374,38.934 127.729,38.934 126.045,37.25 106.7,37.25
I2C2_SCL_DC-DC: DD1.29 R4.1 X1.13 | length 53.7
  Top Layer w0.25: DD1.29 92.25,29.783 92.225,29.758 92.225,28.075 95.44,24.86 X1.13 ; v1(122.7,38.2) R4.1
  Bottom Layer w0.25: v1(122.7,24.9) v1(122.7,38.2)
I2C2_SDA_DC-DC: DD1.30 R5.1 X1.12 | length 55.1
  Top Layer w0.25: DD1.30 92.75,28.65 95.8,25.6 v1(120.7,25.6) 126.8,25.6 127.437,26.237 128.482,26.237 129.372,27.127 130.267,27.127 X1.12 ; v1(120.7,38.2) R5.1
  Bottom Layer w0.25: v1(120.7,25.6) v1(120.7,38.2)
IRQ_BATT_PM: DD1.38 R27.1 X1.6 | length 40.7
  Top Layer w0.25: DD1.38 96.232,34.735 97.109,34.719 97.182,34.718 97.2,34.7 97.236,34.7 97.736,34.2 v1(112.7,34.2) 127,34.2 127.343,33.857 129.377,33.857 X1.6 ; v1(112.7,38.2) R27.1
  Bottom Layer w0.25: v1(112.7,34.2) v1(112.7,38.2)
IRQ_LOAD_PM: DD1.37 R28.1 X1.7 | length 38.9
  Top Layer w0.25: DD1.37 97.05,34.25 97.9,33.4 127.08,33.4 X1.7 ; v1(114.7,38.2) R28.1
  Bottom Layer w0.25: v1(114.689,33.38) 114.694,33.386 114.694,38.194 v1(114.7,38.2)
IRQ_NFLT: DD1.35 R30.2 X1.9 | length 41.2
  Top Layer w0.25: DD1.35 95.635,33.241 96.732,33.241 98.173,31.8 v1(118.8,31.8) 125.9,31.8 127.76,29.94 X1.9 ; v1(118.7,38.2) R30.2
  Bottom Layer w0.25: v1(118.7,38.2) 118.75,38.15 118.75,31.85 v1(118.8,31.8)
IRQ_NPGD: DD1.36 R29.2 X1.8 | length 43
  Top Layer w0.25: DD1.36 96.859,33.75 98.009,32.6 v1(116.7,32.6) 126.1,32.6 127.383,31.317 129.377,31.317 X1.8 ; v1(116.7,38.2) R29.2
  Bottom Layer w0.25: v1(116.7,32.6) v1(116.7,38.2)
IRQ_SOLAR_PM: DD1.40 R26.1 X1.4 | length 39.2
  Top Layer w0.25: DD1.40 v1@110.7,35.75 ; v1(110.7,35.7) 127.035,35.7 127.518,36.183 129.163,36.183 X1.4 ; v1(110.7,38.2) R26.1
  Bottom Layer w0.25: v1(110.7,35.7) v1(110.7,38.2)
LATCH_PIN: DD1.20 DD2.12 DD4.12 | length 38.2
  Top Layer w0.25: DD4.12 79.135,24.925 77.61,23.4 68.66,23.4 67.135,24.925 67.135,26.835 68.8,28.5 86.706,28.5 87.735,29.529 87.735,30.359 DD1.20
MODE_DC_DC: DD1.39 X1.5 | length 32.5
  Top Layer w0.25: DD1.39 97.35,35.25 97.58,35.02 X1.5
NetC2_2: C2.2 DA1.1 DA1.3 L1.2 | length 8.4
  Top Layer w0.5: DA1.1 114.77,42.854 114.046,42.854 113.7,43.2 113.7,44.307 114.139,44.746 114.77,44.746 DA1.3 ; DA1.1@114.993,42.85 117.125,42.85 C2.2 117.212,42.788 119.741,42.788 L1.2
NetC6_2: C6.2 DD1.5 ZQ1.1 | length 7.9
  Top Layer w0.25: C6.2 79.175,38.925 ZQ1.1 ; ZQ1.1@79.2,38.798 80.248,37.75 DD1.5
NetC7_2: C7.2 DD1.6 ZQ1.3 | length 6.7
  Top Layer w0.25: C7.2 81.525,35.075 ZQ1.3 81.5,36.1 82.65,37.25 DD1.6
NetC19_1: C19.1 FA1.1 X3.2 | length 9.7
  Top Layer w0.5: FA1.1 119.712,18.988 124.787,18.988 C19.1 124.812,18.988 129.388,18.988 X3.2
NetDD1_60: DD1.60 R3.2 | length 2.6
  Top Layer w0.25: DD1.60 88.265,41.611 88.265,40.63 88.6,40.295 v1(88.6,40.2)
  Bottom Layer w0.5: v1(88.6,40.2) 88.627,40.2 88.727,40.1 R3.2
NetDD2_1: DD2.1 HL2.1 | length 44.4
  Top Layer w0.25: HL2.1 24,24.5 57.1,24.5 61.1,20.5 61.882,20.5 62.055,20.327 DD2.1
NetDD2_2: DD2.2 HL3.1 | length 45.3
  Top Layer w0.25: HL3.1 24.5,17 60.8,17 63.325,19.525 DD2.2
NetDD2_3: DD2.3 HL4.1 | length 17.5
  Top Layer w0.25: HL4.1 51.8,29.8 54.972,29.8 64.137,20.635 64.422,20.635 64.595,20.461 DD2.3
NetDD2_4: DD2.4 HL5.1 | length 16.5
  Top Layer w0.25: HL5.1 51.901,21.501 53.543,19.859 59.641,19.859 v1(61,18.5) ; v1(63.5,18.5) 64.84,18.5 65.865,19.525 DD2.4
  Bottom Layer w0.25: v1(61,18.5) v1(63.5,18.5)
NetDD2_5: DD2.5 HL6.1 | length 18.8
  Top Layer w0.25: HL6.1 51.776,13.026 54.45,15.7 63.31,15.7 67.135,19.525 DD2.5
NetDD2_6: DD2.6 HL7.1 | length 10.3
  Top Layer w0.25: HL7.1 61.851,13.851 63.451,13.851 68.405,18.805 DD2.6
NetDD2_7: DD2.7 HL8.1 | length 7
  Top Layer w0.25: DD2.7 69.675,15.426 71.101,14.001 HL8.1
NetDD2_9: DD2.9 DD4.14 | length 7
  Top Layer w0.25: DD2.9 70.945,25.073 71.718,24.3 75.97,24.3 76.595,24.925 DD4.14
NetDD2_15: DD2.15 HL1.1 | length 49.7
  Top Layer w0.25: HL1.1@20.7,29.5 21.4,29.5 23.2,27.7 27.7,27.7 29.3,26.1 45.5,26.1 50.3,30.9 54.7,30.9 61.5,24.1 62.5,24.1 63.325,24.925 DD2.15
NetDD4_1: DD4.1 HL10.1 | length 20.6
  Top Layer w0.25: DD4.1 74.055,19.525 77.38,16.2 88.076,16.2 91.226,13.051 HL10.1
NetDD4_2: DD4.2 HL11.1 | length 28.3
  Top Layer w0.25: DD4.2 75.325,19.525 77.85,17 96.276,17 100.226,13.051 HL11.1
NetDD4_3: DD4.3 HL12.1 | length 36.1
  Top Layer w0.25: DD4.3 76.595,19.525 78.32,17.8 103,17.8 107.522,13.278 109.274,13.278 HL12.1
NetDD4_4: DD4.4 HL13.1 | length 43.8
  Top Layer w0.25: DD4.4 77.865,19.525 78.89,18.5 103.7,18.5 106,16.2 113.5,16.2 116.649,13.051 HL13.1
NetDD4_15: DD4.15 HL9.1 | length 21
  Top Layer w0.25: v1(75.2,21.5) 73.8,21.5 73.1,20.8 73.1,19.3 77.2,15.2 79.901,15.2 81.101,14.001 HL9.1 ; v1(75.3,26.7) 75.312,26.688 75.312,25.413 DD4.15
  Bottom Layer w0.25: v1(75.2,21.5) 75.25,21.55 75.25,26.65 v1(75.3,26.7)
NetFV1_1: FV1.1 R18.1 X3.1 | length 9.1
  Top Layer w0.5: R18.1 124.579,16.8 FV1.1 ; FV1.1 124.6,16.89 124.621,16.911 129.311,16.911 X3.1
NetHL1_2: HL1.2 R11.1 | length 2.4
  Top Layer w0.25: HL1.2 R11.1
NetHL2_2: HL2.2 R12.1 | length 2.4
  Top Layer w0.25: HL2.2 R12.1
NetHL3_2: HL3.2 R13.1 | length 2.4
  Top Layer w0.25: HL3.2 R13.1
NetHL4_2: HL4.2 R14.1 | length 2.4
  Top Layer w0.25: HL4.2 R14.1
NetHL5_2: HL5.2 R15.1 | length 2.4
  Top Layer w0.25: HL5.2 R15.1
NetHL6_2: HL6.2 R17.1 | length 2.2
  Top Layer w0.25: HL6.2 R17.1
NetHL7_2: HL7.2 R19.1 | length 2.4
  Top Layer w0.25: HL7.2 R19.1
NetHL8_2: HL8.2 R20.1 | length 2.4
  Top Layer w0.25: HL8.2 R20.1
NetHL9_2: HL9.2 R21.1 | length 2.4
  Top Layer w0.25: HL9.2 R21.1
NetHL10_2: HL10.2 R22.1 | length 2.2
  Top Layer w0.25: HL10.2 R22.1
NetHL11_2: HL11.2 R23.1 | length 2.2
  Top Layer w0.25: HL11.2 R23.1
NetHL12_2: HL12.2 R24.1 | length 2.2
  Top Layer w0.25: HL12.2 R24.1
NetHL13_2: HL13.2 R25.1 | length 2.2
  Top Layer w0.25: HL13.2 R25.1
NRST: C5.2 DD1.7 X2.5 | length 16.9
  Top Layer w0.25: DD1.7 84.389,36.765 85.565,36.765 v1(85.6,36.8)
  Bottom Layer w0.25: C5.2 85.525,38.891 84.35,40.066 84.35,41.97 X2.5
  Bottom Layer w0.5: C5.2 85.581,37.744 85.581,36.819 v1(85.6,36.8)
SPI1_MOSI: DD1.23 DD2.14 | length 30.6
  Top Layer w0.25: DD2.14 64.595,24.925 67.02,22.5 83.4,22.5 89.25,28.35 DD1.23
SPI1_SCK: DD1.21 DD2.11 DD4.11 | length 26.2
  Top Layer w0.25: DD2.11 68.461,25.456 68.461,26.761 69.3,27.6 81.2,27.6 ; DD4.11 80.405,26.805 81.2,27.6 ; DD1.21 88.235,30.359 88.235,28.735 87.1,27.6 81.2,27.6
Supply: C1.2 L1.1 X1.1 | length 7.9
  Top Layer w0.5: L1.1 121.259,42.788 123.687,42.788 C1.2 124.698,42.775 v1@124.773,42.7
  Bottom Layer w0.5: v1@124.763,42.7 125.4,42.7 X1.1
  other v1: 124.8,42.7
SWCLK: DD1.49 X2.3 | length 8.5
  Top Layer w0.25: DD1.49 93.75,42.217 96.46,44.927 X2.3
SWDIO: DD1.46 X2.2 | length 12.7
  Top Layer w0.25: DD1.46 95.641,38.735 96.681,38.735 96.741,38.675 97.259,38.675 99,40.416 X2.2
TS_1Wire: DD1.24 DD3.2 R16.1 R18.2 | length 35.8
  Top Layer w0.25: DD1.24 89.765,30.359 89.765,29.529 99.319,19.975 R16.1 103.275,19.975 104,20.7 108.244,20.7 108.644,20.3 DD3.2
  Top Layer w0.5: DD3.2 115.375,20.3 118.775,16.9 R18.2
pads on no net: A1.2 A1.3 A1.4 A1.5 A1.7 A1.8 A1.9 A1.10 A1.11 A1.12 A1.13 A1.14 A1.15 A1.16 A1.17 A1.18 A1.21 DA1.4 DD1.3 DD1.4 DD1.8 DD1.9 DD1.10 DD1.11 DD1.14 DD1.15 DD1.16 DD1.17 DD1.22 DD1.25 DD1.26 DD1.27 DD1.28 DD1.41 DD1.44 DD1.45 DD1.50 DD1.51 DD1.52 DD1.53 DD1.54 DD1.55 DD1.62 DD4.5 DD4.6 DD4.7 DD4.9 ZQ1.2 ZQ1.4

## Polygon pours and split planes (outlines as drawn)
GND on Bottom Layer "GND_L02_P000" (solid, remove dead copper, pour order 0): 0,46 10,56 127,56 137,46 137,0 0,0
GND on Top Layer "GND_L01_P003" (solid, remove dead copper, pour order 3): 0,46 10,56 127,56 137,46 137,0 0,0

## Other copper
Top Layer:
  pour cut-out: 41.8,32.5 41.8,40.711 41.829,40.74 41.769,40.8 40,40.8 40,32.5
  pour cut-out: 32,33 42,33 42,31 32,31
  pour cut-out: 30,42 32,42 32,31 30,31
Multi-Layer:
  pour cut-out: 28,42 28,56 44,56 44,42

## Silkscreen, mask and mechanical layers (free items; w line width, h text height)
Top Overlay:
  text "АНГМ.758723.001" at 114,3.017 h1.52
  text "v1 06.2026" at 116.2,1.517 h1.52
Board_Outline:
  the board outline again, w0.254

## Text inside footprints (layer, text, board x,y; h text height)
DA1: Top Overlay "*" at 116.3,42.7 h1.27 r180; Mechanical 13 "*" at 114.364,43.434 h1.27 r180
DD1: Top Overlay "*" at 82.69,39.746 h1.27; Mechanical 13 "*" at 85.009,39.365 h1.27
X1: Mechanical 13 "RefDes2" at 128.635,34.703 h1.27 r270